# Altium PCB PCB_Intel_Board-v1.0.PcbDoc
Units mil, origin at the board's own origin, x right, y up, seen from the top; angles counter-clockwise.
Board outline 11811.02 x 3543.31 mil, 2 copper layers (Top Layer, Bottom Layer), stack 61.811 mil thick; 11 components, 0 nets, 128 pads, 0 vias.
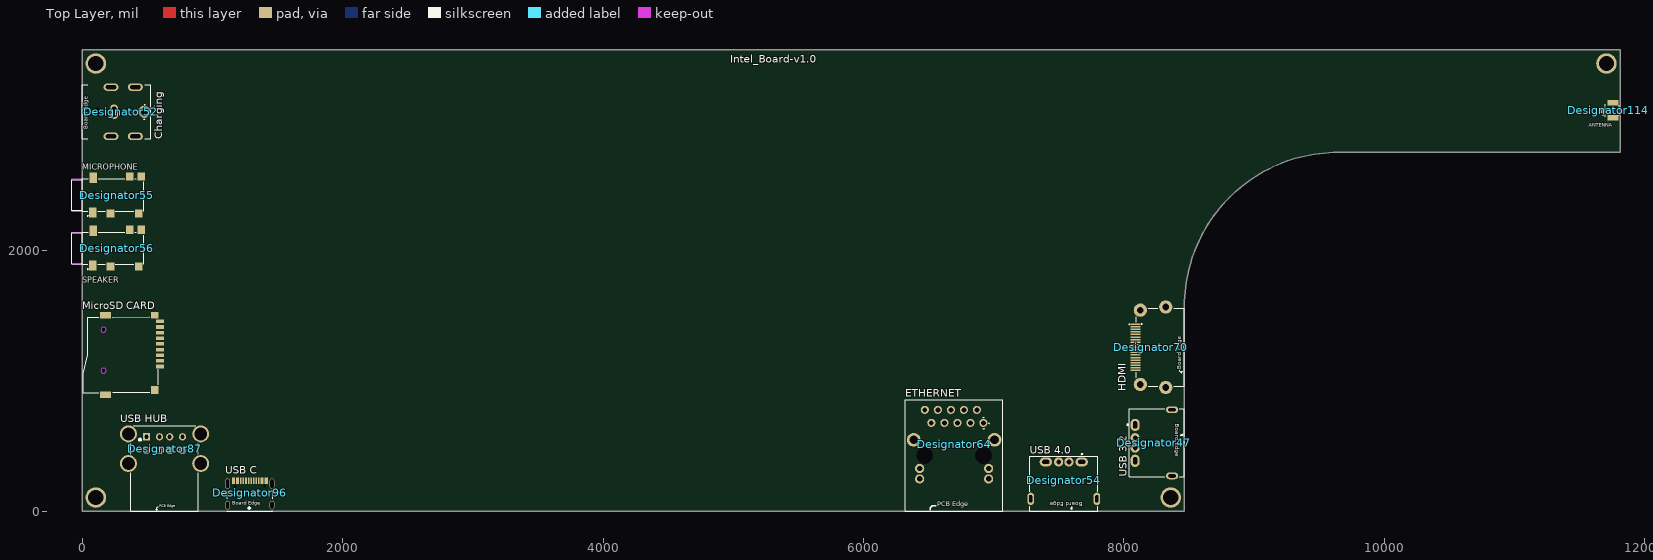
[diagram p0: Top Layer view]
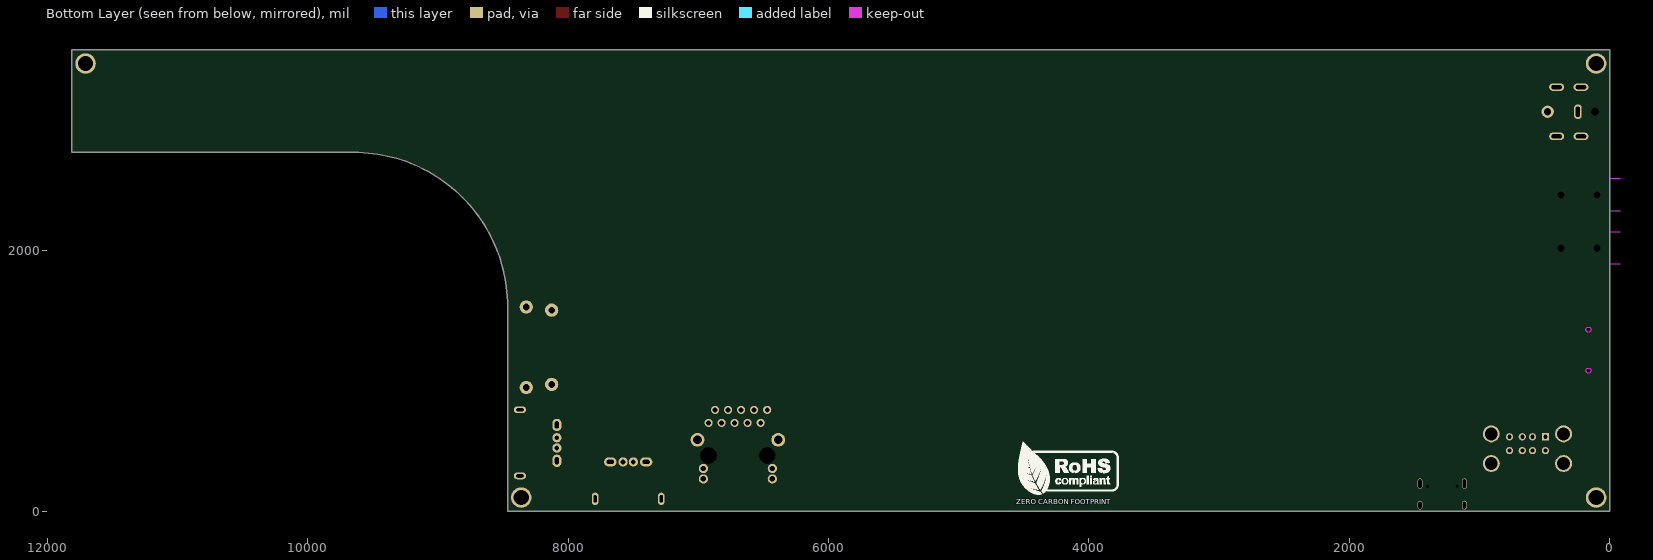
[diagram p1: Bottom Layer view, seen from below]

## Layer stack, top to bottom
Top Solder: solder mask 0.3937, Solder Resist, Dk 3.5
Top Layer: signal copper 1.378
Dielectric 1: core 59.0551, FR-4, Dk 4.8
Bottom Layer: signal copper 1.378
Bottom Solder: solder mask 0.3937, Solder Resist, Dk 3.5

## Board outline
0,0 8464.57,0 8464.57,1574.8 cw(c9645.67,1574.8) 9645.67,2755.91 11811.02,2755.91 11811.02,3543.31 0,3543.31

## Design rules (kind name [scope] priority, off if disabled: settings)
Clearance [All] p1: gap=10 ignorepadtopadclearanceinfootprint=FALSE
HoleToHoleClearance [All] p1: gap=0 allowstackedmicrovias=TRUE
MinimumSolderMaskSliver [All] p1: minsoldermaskwidth=0
PolygonConnect [All] p1: connectstyle=Relief reliefconductorwidth=10 reliefentries=4 polygonreliefangle="90 Angle" airgapwidth=10
RoutingVias [All] p1: holewidth=11.81 width=23.62 viastyle="Through Hole" minholewidth=11.81 minwidth=23.62 maxholewidth=11.81 maxwidth=23.62
SilkToSilkClearance [All] p1: silktosilkclearance=0
SilkToSolderMaskClearance [IsPad] p1: minsilkscreentomaskgap=0 clearancetoexposedcopper=TRUE
SolderMaskExpansion [All] p1: expansion=4 istentingtop=FALSE
UnRoutedNet [All] p1: checkbadconnections=TRUE
Width [All] p1: maxlimit=100 minlimit=10 preferedwidth=12 minimp=50.000000 maximp=50.000000 favimp=50.000000
25 further rules are at their usual default settings.

## Components (designator, comment, footprint, x,y, rotation, side; value= is the part's Value field where it differs from the comment)
Designator47 "Comment" U-A-24DD-Y-14 8086,525 r270 top
Designator52 "Comment" DC-053D-25A 295.09,3068 r90 top
Designator54 "Comment" U-A-24DD-Y-14 7538.06,378.46 r180 top
Designator55 "Comment" PJ-332D-6A 266.71,2428 r90 top
Designator56 "Comment" PJ-332D-6A 266.71,2020 r90 top
Designator64 "Comment" ARJM11C7-114-BA-EW2 6696,509.75 r0 top
Designator70 "Comment" 10029449-111RLF 8205,1259 r90 top
Designator87 "Comment" U224-081N-1BR61 632.44,479.98 r0 top
Designator96 "Comment" TYPE-C-31-M-12_ 1161.29,234.01 r0 top
Designator114 "Comment" U.FL-R-SMT-1(80)_ 11717.65,3079.07 r270 top
"MicroSD CARD" "Comment" TF-01A 388,1200 r270 top

## Footprints (in the part's own frame and the unit in brackets; to place one, negate y for a bottom-side part, rotate by r counter-clockwise, add the part's x,y. Pads: shape width x height; smd on the part's side, far side on the other; paste and mask are expansions set on the pad)
10029449-111RLF [mm]
  rect 0.3x1.9 smd: 1(4.5,2.95) 2(4,2.95) 3(3.5,2.95) 4(3,2.95) 5(2.5,2.95) 6(2,2.95) 7(1.5,2.95) 8(1,2.95) 9(0.5,2.95) 10(0,2.95) 11(-0.5,2.95) 12(-1,2.95) 13(-1.5,2.95) 14(-2,2.95) 15(-2.5,2.95) 16(-3,2.95) 17(-3.5,2.95) 18(-4,2.95) 19(-4.5,2.95)
  round 2.6 hole 1.3: S1(-7.85,-2.95) S2(-7.25,2) S3(7.25,2) S4(7.85,-2.95)
  silkscreen extent -7.62,-6.6 7.62,4.22, body extent -8.35,-6.55 7.85,3.55, height 6.28
ARJM11C7-114-BA-EW2 [mm]
  round 1.6 hole 0.94: 1(5.715,4.28) 2(4.445,6.82) 3(3.175,4.28) 4(1.905,6.82) 5(0.635,4.28) 6(-0.635,6.82) 7(-1.905,4.28) 8(-3.175,6.82) 9(-4.445,4.28) 10(-5.715,6.82)
  round 1.8 hole 1.04: 11(6.725,-4.61) 12(6.725,-6.64) 13(-6.725,-4.61) 14(-6.725,-6.64)
  round 0 hole 3.25 unplated: MH1(-5.715,-2.07) MH2(5.715,-2.07)
  round 2.7 hole 1.7: SH1(-7.875,0.98) SH2(7.875,0.98)
  silkscreen extent -9.5,-12.94 9.5,8.8, body extent -9.45,-12.89 9.45,8.76, height 14.8
DC-053D-25A [mm]
  round 2.4 hole 1.4 mask+0.05: 1(0,-4.625)
  oval 2.9x1.5 hole 0.82 slot 2 at 0 deg mask+0.05: 2(0,1.275)
  oval 1.5x2.9 hole 0.82 slot 2 at 90 deg mask+0.05: 3(-4.8,-2.875) 3(-4.8,1.875) 3(4.8,-2.875) 3(4.8,1.875)
  round 0 hole 1.6 unplated mask+0.05: MH(0,4.625)
  silkscreen extent -5.28,-5.84 5.28,7.49, body extent -5.26,-5.78 5.25,7.42, height 10.2
PJ-332D-6A [mm]
  rect 2x1.5 smd paste+0 mask+0.051: 1(-3.4,4.725) 2(3.4,4.625)
  rect 1.6x1.5 smd paste+0 mask+0.051: 3(-3.6,1.275) 4(3.6,-2.525) 5(-3.6,-4.225) 6(3.6,-4.725)
  round 0 hole 1.4 unplated: 4(0,4.275) 5(0,-2.725)
  Keep-Out Layer lines w0.152: -3.15,6.775 -3.15,8.775 -3.15,6.775 ; -3.15,6.775 3.15,6.775 ; -3.15,6.775 3.15,6.775 ; 3.15,6.775 3.15,8.775 3.15,6.775
  silkscreen extent -4.19,-5.22 3.15,8.8, body extent -3.85,-5.22 3.85,8.78, height 5.3
TF-01A [mm]
  rect 0.7x1.6 smd paste+0 mask+0.051: 1(2.245,5.3) 2(1.145,5.3) 3(0.046,5.3) 4(-1.054,5.3) 5(-2.154,5.3) 6(-3.255,5.3) 7(-4.354,5.3) 8(-5.454,5.3) 9(-6.554,5.3)
  rect 1.2x1.5 smd paste+0 mask+0.051: 10(-7.754,4.3)
  rect 1.2x2.2 smd paste+0 mask+0.051: 11(-7.746,-5.3) 12(7.754,-5.3)
  rect 1.6x1.5 smd paste+0 mask+0.051: 13(6.854,4.3)
  round 0 hole 1 unplated: MH(-4.946,-5.7) MH(3.054,-5.7)
  Keep-Out Layer board cut-out: 3.554,-5.7 3.485,-5.453 3.302,-5.272 3.054,-5.206 2.806,-5.272 2.623,-5.453 2.554,-5.7 2.554,-5.7 2.623,-5.947 2.806,-6.128 3.054,-6.194 3.302,-6.128 3.485,-5.947 3.554,-5.7
  Keep-Out Layer board cut-out: -4.446,-5.7 -4.515,-5.453 -4.698,-5.272 -4.946,-5.206 -5.194,-5.272 -5.377,-5.453 -5.446,-5.7 -5.446,-5.7 -5.377,-5.947 -5.194,-6.128 -4.946,-6.194 -4.698,-6.128 -4.515,-5.947 -4.446,-5.7
  silkscreen extent -7.41,-9.68 7.39,4.93, body extent -8.27,-9.68 8.28,5.32, height 1.95
TYPE-C-31-M-12_ [mm]
  rect 0.6x1.2 smd: A1/B12(0,0) A4/B9(0.8,0) B1/A12(6.4,0) B4/A9(5.6,0)
  rect 0.3x1.2 smd: A5(1.95,0) A6(2.95,0) A7(3.45,0) A8(4.45,0) B5(4.95,0) B6(3.95,0) B7(2.45,0) B8(1.45,0)
  round 0 hole 0.62 unplated: MH(0.31,-1.07) MH(6.09,-1.07)
  oval 0.9x2 hole 0.6 slot 1.7 at 90 deg: S1(7.525,-0.57) S4(-1.125,-0.57)
  oval 0.9x1.7 hole 0.6 slot 1.4 at 90 deg: S2(7.525,-4.75) S3(-1.125,-4.75)
  silkscreen extent -1.3,-5.94 7.7,-1.93, body extent -1.27,-7.32 7.67,0.58, height 3.31
U224-081N-1BR61 [mm]
  rect 1.4x1.4 hole 0.8 paste-2539.97 mask+0.05: 1(-3.5,2.325)
  round 1.4 hole 0.8 paste-2539.97 mask+0.05: 2(-1,2.325) 3(1,2.325) 4(3.5,2.325) 5(-3.5,-0.375) 6(-1,-0.375) 7(1,-0.375) 8(3.5,-0.375)
  round 3.3 hole 2.5 paste-2539.97 mask+0.05: SH1(-7.05,-2.895) SH2(-7.05,2.895) SH3(7.05,2.895) SH4(7.05,-2.895)
  silkscreen extent -6.61,-12.2 6.53,4.47, body extent -8.05,-12.88 8.05,4.37, height 16.3
U-A-24DD-Y-14 [mm]
  oval 2.4x1.8 hole 0.762 slot 1.4 at 0 deg: 1(-3.5,0) 4(3.5,0)
  round 1.8 hole 0.92: 2(-1,0) 3(1,0)
  oval 1.3x2.4 hole 0.62 slot 1.4 at 90 deg: MH1(-6.45,7.2) MH2(6.45,7.2)
  silkscreen extent -6.6,-1.55 6.6,9.61, body extent -5.05,-0.63 4.95,12.47, height 6.35
U.FL-R-SMT-1(80)_ [mm]
  rect 1.02x1.07 smd: 1(0,-0.974)
  rect 1.07x2.2 smd: 2(1.475,0.974) 3(-1.475,0.974)
  silkscreen extent -1.22,-1.09 1.22,2.21, body extent -1.47,-0.74 1.53,2.36, height 1.2

## Free pads (board coordinates)
  round 157.48 hole 118.11: MH1(105,3438) MH2(105,105) MH3(8360,105) MH4(11706,3438)

## Nets (pads, with @x,y where several pads share a name; then routed paths per layer and width w, separated by ;. In a path a pad name is that pad's centre, name@x,y a point inside that pad or via, vN(x,y) a via of type N, cw(c..) or ccw(c..) an arc to the next point about the centre after c; other vN are vias at no path point)
pads on no net: "MicroSD CARD.1" "MicroSD CARD.2" "MicroSD CARD.3" "MicroSD CARD.4" "MicroSD CARD.5" "MicroSD CARD.6" "MicroSD CARD.7" "MicroSD CARD.8" "MicroSD CARD.9" "MicroSD CARD.10" "MicroSD CARD.11" "MicroSD CARD.12" "MicroSD CARD.13" "MicroSD CARD.MH" Designator47.1 Designator47.2 Designator47.3 Designator47.4 Designator47.MH1 Designator47.MH2 Designator52.1 Designator52.2 Designator52.3 Designator52.MH Designator54.1 Designator54.2 Designator54.3 Designator54.4 Designator54.MH1 Designator54.MH2 Designator55.1 Designator55.2 Designator55.3 Designator55.4 Designator55.5 Designator55.6 Designator56.1 Designator56.2 Designator56.3 Designator56.4 Designator56.5 Designator56.6 Designator64.1 Designator64.2 Designator64.3 Designator64.4 Designator64.5 Designator64.6 Designator64.7 Designator64.8 Designator64.9 Designator64.10 Designator64.11 Designator64.12 Designator64.13 Designator64.14 Designator64.MH1 Designator64.MH2 Designator64.SH1 Designator64.SH2 Designator70.1 Designator70.2 Designator70.3 Designator70.4 Designator70.5 Designator70.6 Designator70.7 Designator70.8 Designator70.9 Designator70.10 Designator70.11 Designator70.12 Designator70.13 Designator70.14 Designator70.15 Designator70.16 Designator70.17 Designator70.18 Designator70.19 Designator70.S1 Designator70.S2 Designator70.S3 Designator70.S4 Designator87.1 Designator87.2 Designator87.3 Designator87.4 Designator87.5 Designator87.6 Designator87.7 Designator87.8 Designator87.SH1 Designator87.SH2 Designator87.SH3 Designator87.SH4 Designator96.A1/B12 Designator96.A4/B9 Designator96.A5 Designator96.A6 Designator96.A7 Designator96.A8 Designator96.B1/A12 Designator96.B4/A9 Designator96.B5 Designator96.B6 Designator96.B7 Designator96.B8 Designator96.MH Designator96.S1 Designator96.S2 Designator96.S3 Designator96.S4 Designator114.1 Designator114.2 Designator114.3

## Silkscreen, mask and mechanical layers (free items; w line width, h text height)
Top Overlay:
  text "Intel_Board-v1.0" at 4977.5,3426.01 h100
  text "ANTENNA" at 11570.71,2940.36 h50
  text "Charging" at 632.07,2857 h100 r90
  text "MICROPHONE" at 0,2605.93 h75
  text "SPEAKER" at 0.41,1737.93 h75
  text "HDMI" at 8032.87,920.59 h100 r90
  text "ETHERNET" at 6321.5,858.93 h100
  text "USB HUB" at 293,664.93 h100
  text "USB 4.0" at 7276.06,423.13 h100
  text "USB C" at 1100,266.94 h100
  text "USB 3.2" at 8041.33,263 h100 r90
Bottom Overlay:
  drawing of 16 lines, arcs and shapes, not listed
  text "ZERO CARBON FOOTPRINT" at 4557.97,53 h40
Board_Outline:
  the board outline again, w20

## Dimensions
11811.02,2755.91 to 8464.57,0 on Board_Dimensions
11811.02,2755.91 to 8464.57,0 on Board_Dimensions
11811.02,3543.31 to 11811.02,2755.91 on Board_Dimensions
11811.02,3543.31 to 8464.57,0 on Board_Dimensions
0,3543.31 to 11811.02,3543.31 on Board_Dimensions

## Text inside footprints (layer, text, board x,y; h text height)
Designator47: Top Overlay "Board Edge" at 8395,670 h30 r270
Designator52: Top Overlay "Board Edge" at 41.1,2934 h30 r90
Designator54: Top Overlay "Board Edge" at 7683.06,69.47 h30 r180
Designator64: Top Overlay "PCB Edge" at 6567,25.7 h60
Designator70: Top Overlay "Board Edge" at 8439.28,1088.85 h30 r90
Designator87: Top Overlay "PCB Edge" at 592.1,23.22 h31.5
Designator96: Top Overlay "Board Edge" at 1152.29,51.34 h28